# Altium PCB PCB1.PcbDoc
Units mm, origin at the board's own origin, x right, y up, seen from the top; angles counter-clockwise.
Board outline 76.19 x 12.9 mm, 4 copper layers (Top Layer, Layer 1, Layer 2, Bottom Layer), stack 1.746 mm thick; 67 components, 48 nets, 202 pads, 115 vias.
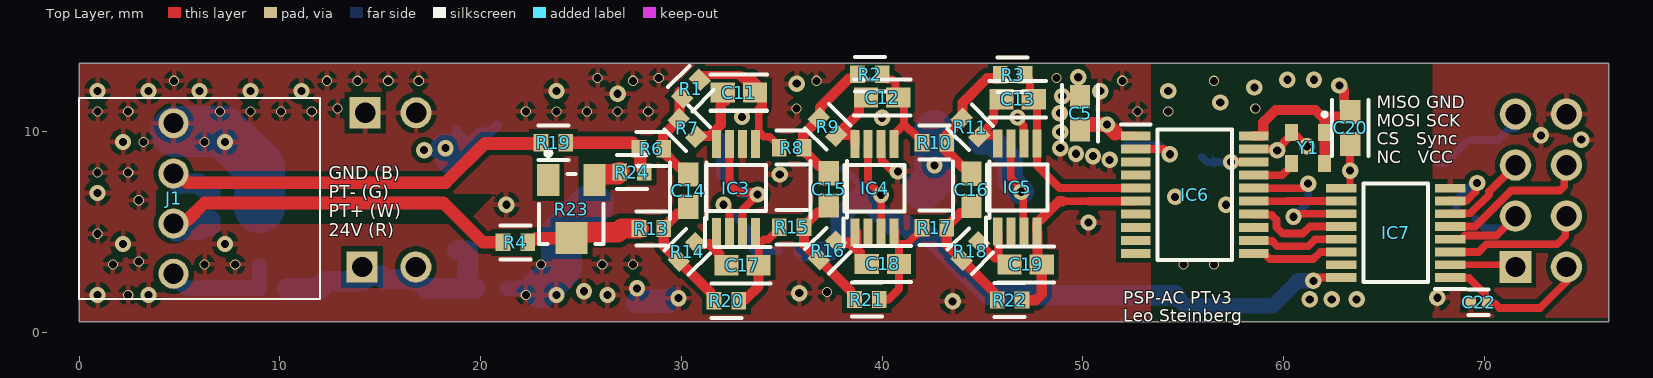
[diagram p0: Top Layer view]
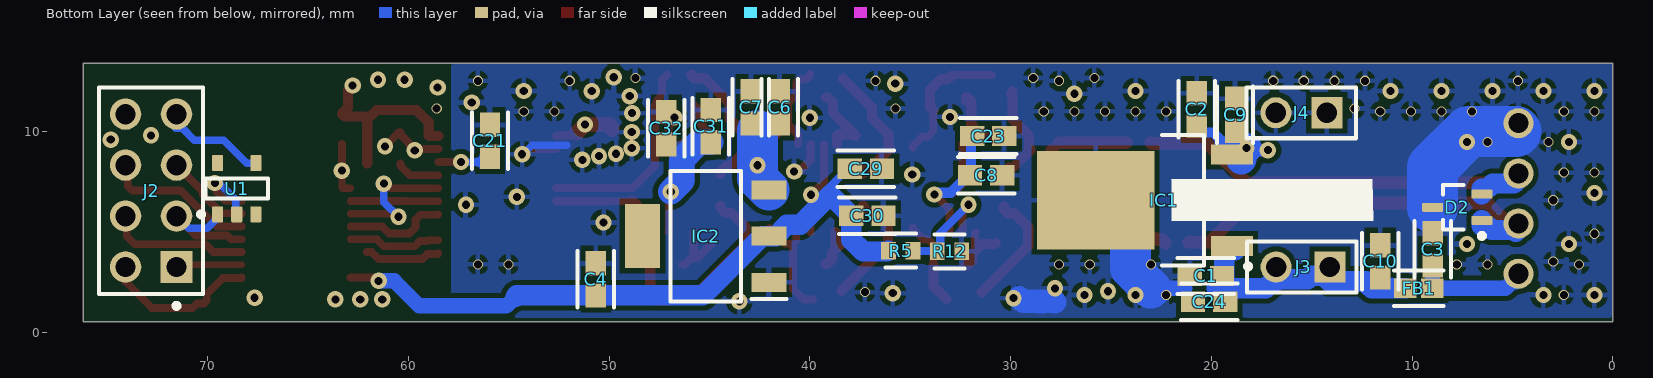
[diagram p1: Bottom Layer view, seen from below]
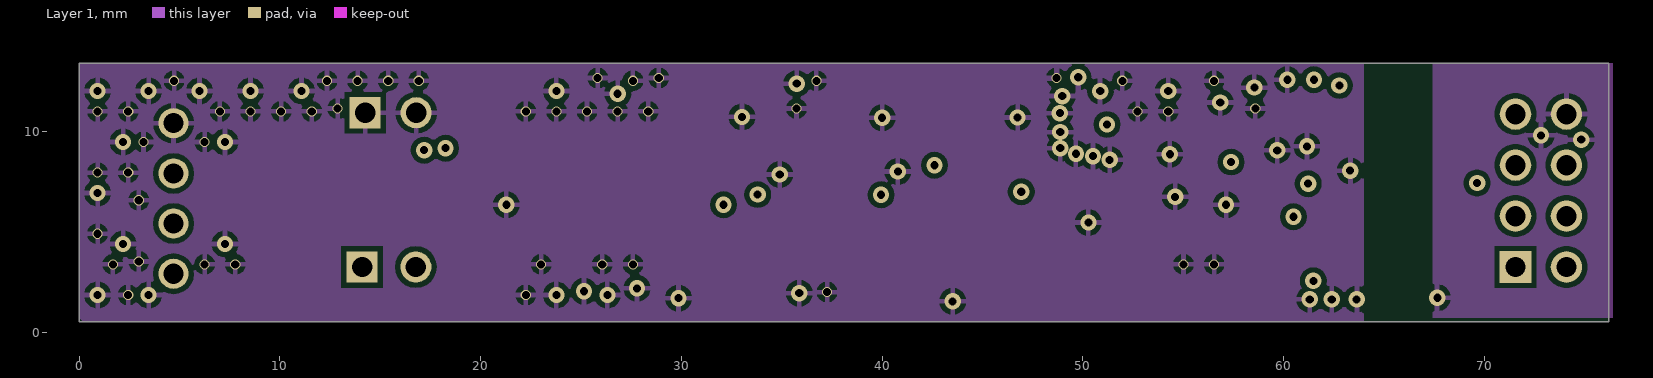
[diagram p2: Layer 1]
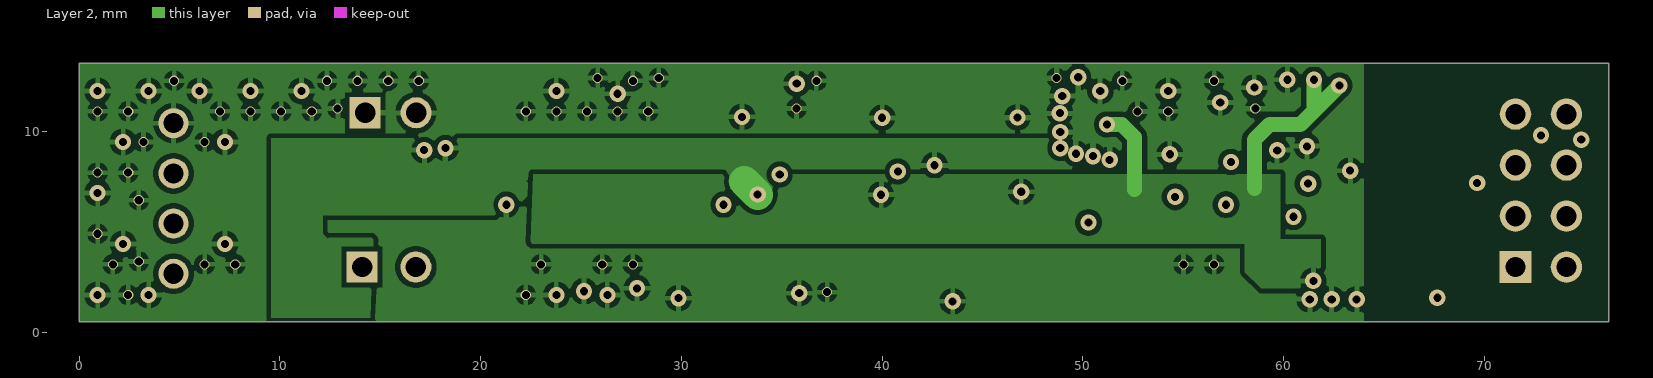
[diagram p3: Layer 2]
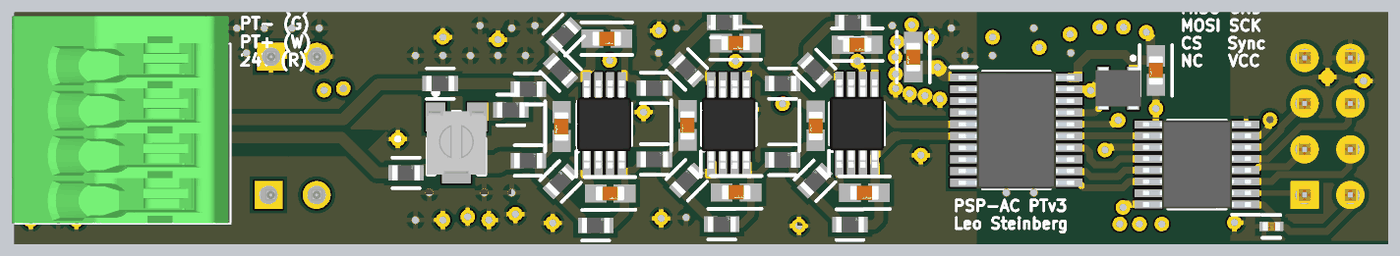
[diagram p4: 3D render of the assembled board from above, using the file's embedded part models]
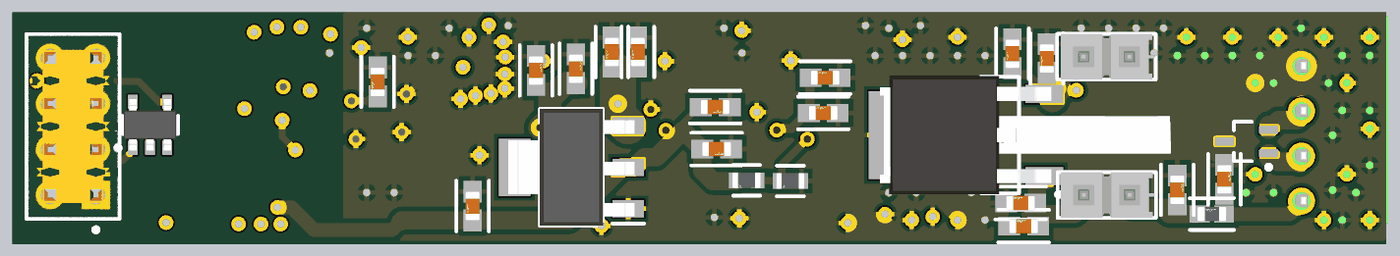
[diagram p5: 3D render of the assembled board from below, using the file's embedded part models]

## Layer stack, top to bottom
Top Solder: solder mask 0.0127, Solder Resist, Dk 3.3
Top Layer: signal copper 0.0178
Dielectric 1: prepreg 0.0711, PP-006, Dk 4.1
Layer 1: signal copper 0.035
Dielectric1: core 1.4986, FR-4, Dk 4.3
Layer 2: signal copper 0.035
Dielectric 2: prepreg 0.0711, PP-006, Dk 4.1
Bottom Layer: signal copper 0.0178
Bottom Solder: solder mask 0.0127, Solder Resist, Dk 3.3

## Board outline
0,0.508 76.194,0.508 76.194,13.409 0,13.409

## Design rules (kind name [scope] priority, off if disabled: settings)
Clearance [All] p1: gap=0.254 ignorepadtopadclearanceinfootprint=TRUE except(0.15: Arc-Arc Arc-Track Track-Track; 0.2: Arc-SMDPad Track-SMDPad SMDPad-SMDPad; 0.35: Arc-THPad Track-THPad)
DiffPairsRouting [All] p1: maxlimit=5.08 minlimit=0.254 mostfreqgap=0.381 toplayer_minwidth=0.381 toplayer_maxwidth=1.27 toplayer_prefwidth=0.508 midlayer1_minwidth=0.381 midlayer1_maxwidth=1.27 midlayer1_prefwidth=0.508 midlayer2_minwidth=0.381 midlayer2_maxwidth=1.27 midlayer2_prefwidth=0.508 bottomlayer_minwidth=0.381 bottomlayer_maxwidth=1.27 bottomlayer_prefwidth=0.508 maxuncoupledlength=12.7
HoleSize [All] p1: absolutevalues=TRUE maxlimit=2.54 minlimit=0.2 maxpercent=80.000 minpercent=20.000
MinimumSolderMaskSliver [All] p1: minsoldermaskwidth=0.105
PolygonConnect [All] p1: connectstyle=Relief reliefconductorwidth=0.254 reliefentries=4 polygonreliefangle="90 Angle" airgapwidth=0.254
RoomDefinition PCB1 [InComponentClass('PCB1')] p1 off: confinementstyle=ConfineIn formatcopy=TRUE lockcomponents=FALSE outline -189.586,-112.446 -138.786,-112.446 -138.786,-87.046 -189.586,-87.046
RoutingVias [All] p1: holewidth=0.35 width=0.45 viastyle="Through Hole" minholewidth=0.35 minwidth=0.45 maxholewidth=0.711 maxwidth=1.27
SilkToSilkClearance [All] p1: silktosilkclearance=0.105
SilkToSolderMaskClearance [IsPad] p1: minsilkscreentomaskgap=0.155 clearancetoexposedcopper=TRUE
SolderMaskExpansion [All] p1: expansion=0.102 istentingtop=FALSE
Width [All] p1: maxlimit=10 minlimit=0.2 preferedwidth=0.3 minimp=50.000000 maximp=50.000000 favimp=50.000000
25 further rules are at their usual default settings.

## Classes and differential pairs
differential pair FilterOut03: +FilterOut03_+ -FilterOut03_-
differential pair FilterOut02: +FilterOut02_+ -FilterOut02_-
differential pair F03Pin: +F03Pin_+ -F03Pin_-
differential pair F03CR: +F03CR_+ -F03CR_-
differential pair F02Pin: +F02Pin_+ -F02Pin_-
differential pair F02CR: +F02CR_+ -F02CR_-
differential pair PTin: +PTin_+ -PTin_-
differential pair FilterOut01: +FilterOut01_+ -FilterOut01_-
differential pair F01Pin01: +F01Pin01_+ -F01Pin01_-
differential pair F01CR: +F01CR_+ -F01CR_-

## Components (designator, comment, footprint, x,y, rotation, side; value= is the part's Value field where it differs from the comment)
C1 "GRM188R60J106ME47D" FP-GRM188-0_1-e0_2_0_55-IPC_A 20.272,2.801 r0 bottom
C2 "GRM188R60J106ME47D" FP-GRM188-0_1-e0_2_0_55-IPC_A 20.726,11.1 r270 bottom
C3 "GRM188R60J106ME47D" FP-GRM188-0_1-e0_2_0_55-IPC_A 8.972,4.121 r90 bottom
C4 "GRM188R60J106ME47D" FP-GRM188-0_1-e0_2_0_55-IPC_A 50.666,2.635 r270 bottom
C5 "GRM188R60J106ME47D" FP-GRM188-0_1-e0_2_0_55-IPC_A 49.861,10.914 r270 top
C6 "GRM188R60J106ME47D" FP-GRM188-0_1-e0_2_0_55-IPC_A 41.499,11.196 r270 bottom
C7 "GRM188R60J106ME47D" FP-GRM188-0_1-e0_2_0_55-IPC_A 42.94,11.196 r270 bottom
C8 "GRM188R60J106ME47D" FP-GRM188-0_1-e0_2_0_55-IPC_A 31.219,7.812 r0 bottom
C9 "GRM188R60J106ME47D" FP-GRM188-0_1-e0_2_0_55-IPC_A 18.819,10.837 r270 bottom
C10 "GRM188R60J106ME47D" FP-GRM188-0_1-e0_2_0_55-IPC_A 11.584,3.531 r90 bottom
C11 "GRM188R60J106ME47D" FP-GRM188-0_1-e0_2_0_55-IPC_A 32.86,11.938 r0 top
C12 "GRM188R60J106ME47D" FP-GRM188-0_1-e0_2_0_55-IPC_A 40.003,11.69 r0 top
C13 "GRM188R60J106ME47D" FP-GRM188-0_1-e0_2_0_55-IPC_A 46.75,11.604 r0 top
C14 "GRM188R60J106ME47D" FP-GRM188-0_1-e0_2_0_55-IPC_A 30.345,7.052 r270 top
C15 "GRM188R60J106ME47D" FP-GRM188-0_1-e0_2_0_55-IPC_A 37.338,7.114 r270 top
C16 "GRM188R60J106ME47D" FP-GRM188-0_1-e0_2_0_55-IPC_A 44.45,7.089 r270 top
C17 "GRM188R60J106ME47D" FP-GRM188-0_1-e0_2_0_55-IPC_A 33.044,3.336 r0 top
C18 "GRM188R60J106ME47D" FP-GRM188-0_1-e0_2_0_55-IPC_A 40.038,3.398 r0 top
C19 "GRM188R60J106ME47D" FP-GRM188-0_1-e0_2_0_55-IPC_A 47.15,3.373 r0 top
C20 "GRM188R60J106ME47D" FP-GRM188-0_1-e0_2_0_55-IPC_A 63.315,10.173 r270 top
C21 "GRM188R60J106ME47D" FP-GRM188-0_1-e0_2_0_55-IPC_A 55.937,9.536 r270 bottom
C22 "C0402C104K8PACTU" FP-C0402-BB-MFG 69.718,1.502 r180 top value="0.10 μF"
C23 "GRM188R60J106ME47D" FP-GRM188-0_1-e0_2_0_55-IPC_A 31.114,9.773 r0 bottom
C24 "GRM188R60J106ME47D" FP-GRM188-0_1-e0_2_0_55-IPC_A 20.106,1.519 r0 bottom
C29 "GRM188R60J106ME47D" FP-GRM188-0_1-e0_2_0_55-IPC_A 37.212,8.14 r180 bottom
C30 "GRM188R60J106ME47D" FP-GRM188-0_1-e0_2_0_55-IPC_A 37.134,5.8 r180 bottom
C31 "GRM188R60J106ME47D" FP-GRM188-0_1-e0_2_0_55-IPC_A 44.936,10.266 r90 bottom
C32 "GRM188R60J106ME47D" FP-GRM188-0_1-e0_2_0_55-IPC_A 47.15,10.169 r90 bottom
D2 "TPD2E007DCKR" DCK0003A_M 7.747,6.223 r0 bottom
FB1 "BLM18PG181SN1D" FP-BLM18-0_15-t0_8-IPC_B 9.666,2.184 r0 bottom
IC1 "L78M12ACDT-TR" TO228P972X240-3N 23.318,6.579 r0 bottom
IC2 "LM1117MPX-3.3_NOPB" SOT230P700X180-4N 45.186,4.786 r0 bottom
IC3 "THS4561IDGKT" SOP65P490X110-8N 32.719,7.177 r90 top
IC4 "THS4561IDGKT" SOP65P490X110-8N 39.624,7.169 r90 top
IC5 "THS4561IDGKT" SOP65P490X110-8N 46.736,7.208 r90 top
IC6 "ADS131M02IPWR" SOP65P640X120-20N 55.575,6.852 r0 top
IC7 "ISO7761FDBQR" SOP64P600X175-16N 65.589,4.947 r180 top
J1 "1989764" 1989764 4.699,10.411 r270 top
J2 "HTSW-104-07-G-D" FP-HTSW-104-07-G-D-MFG 72.826,7.058 r90 bottom
J3 "TSW-102-26-F-S" SMTC-TSW-102-26-XX-S#1 14.23,3.248 r0 bottom
J4 "TSW-102-26-F-S" SMTC-TSW-102-26-XX-S#2 14.247,10.932 r0 bottom
R1 "CRCW0603200KFKEA" FP-CRCW0603-e3-IPC_C 30.471,12.136 r45 top
R2 "CRCW0603200KFKEA" FP-CRCW0603-e3-IPC_C 39.388,12.85 r0 top
R3 "CRCW0603200KFKEA" FP-CRCW0603-e3-IPC_C 46.5,12.825 r0 top
R4 "CRCW0603200KFKEA" FP-CRCW0603-e3-IPC_C 21.728,4.475 r0 top
R5 "CRCW0603200KFKEA" FP-CRCW0603-e3-IPC_C 35.474,4.063 r0 bottom
R6 "CRCW0603200KFKEA" FP-CRCW0603-e3-IPC_C 28.503,9.132 r0 top
R7 "CRCW0603200KFKEA" FP-CRCW0603-e3-IPC_C 30.295,10.163 r315 top
R8 "CRCW0603200KFKEA" FP-CRCW0603-e3-IPC_C 35.496,9.194 r0 top
R9 "CRCW0603200KFKEA" FP-CRCW0603-e3-IPC_C 37.289,10.225 r315 top
R10 "CRCW0603200KFKEA" FP-CRCW0603-e3-IPC_C 42.608,9.443 r0 top
R11 "CRCW0603200KFKEA" FP-CRCW0603-e3-IPC_C 44.401,10.2 r315 top
R12 "CRCW0603200KFKEA" FP-CRCW0603-e3-IPC_C 33.044,4.027 r0 bottom
R13 "CRCW0603200KFKEA" FP-CRCW0603-e3-IPC_C 28.503,5.164 r0 top
R14 "CRCW0603200KFKEA" FP-CRCW0603-e3-IPC_C 30.295,4.002 r45 top
R15 "CRCW0603200KFKEA" FP-CRCW0603-e3-IPC_C 35.496,5.225 r0 top
R16 "CRCW0603200KFKEA" FP-CRCW0603-e3-IPC_C 37.289,4.064 r45 top
R17 "CRCW0603200KFKEA" FP-CRCW0603-e3-IPC_C 42.608,5.201 r0 top
R18 "CRCW0603200KFKEA" FP-CRCW0603-e3-IPC_C 44.401,4.039 r45 top
R19 "CRCW0603200KFKEA" FP-CRCW0603-e3-IPC_C 23.622,9.439 r0 top
R20 "CRCW0603200KFKEA" FP-CRCW0603-e3-IPC_C 32.245,1.564 r0 top
R21 "CRCW0603200KFKEA" FP-CRCW0603-e3-IPC_C 39.238,1.626 r0 top
R22 "CRCW0603200KFKEA" FP-CRCW0603-e3-IPC_C 46.35,1.601 r0 top
R23 "3313J-1-503E" BOUR-3313J-1_V 24.518,6.135 r270 top
R24 "CRCW0603200KFKEA" FP-CRCW0603-e3-IPC_C 27.539,7.977 r0 top
U1 "SN74AHC1G125DBVR" DBV0005A_L 68.555,7.148 r90 bottom
Y1 "ASDM1-8.000MHZ-LC-T" ASDM 61.223,9.177 r180 top

## Footprints (in the part's own frame and the unit in brackets; to place one, negate y for a bottom-side part, rotate by r counter-clockwise, add the part's x,y. Pads: shape width x height; smd on the part's side, far side on the other; paste and mask are expansions set on the pad)
1989764 [mm]
  round 1.5 hole 1: 1(0,0) 2(2.5,0) 3(5,0) 4(7.5,0)
  silkscreen extent -1.25,-4.7 8.75,7.3, body extent -2.77,-4.82 8.73,7.18, height 13.12
ASDM [mm]
  rect 0.65x0.85 smd: 1(-0.825,-0.775) 2(0.825,-0.775) 3(0.825,0.775) 4(-0.825,0.775)
  silkscreen extent -0.92,-1.77 -0.73,-1.58, body extent -1.25,-1.13 1.25,1.13, height 1
BOUR-3313J-1_V [mm] "SMD, 3-Leads, Body 3.5x3.2mm, Pitch 1.15mm"
  rect 1.6x1.1 smd paste+0: 1(-1.45,-1.15) 3(-1.45,1.15)
  rect 1.6x1.6 smd paste+0: 2(1.45,0)
  silkscreen extent -2.92,-1.6 1.75,1.6, body extent -1.75,-1.65 1.75,1.65, height 2.11
DBV0005A_L [mm] "SOT23, 5-Leads, Body 3.05x1.75mm, Pitch 0.95mm, IPC High Density"
  rrect18% 0.8x0.55 smd: 1(-1.275,0.95) 2(-1.275,0) 3(-1.275,-0.95) 4(1.275,-0.95) 5(1.275,0.95)
  silkscreen extent -1.4,-1.55 0.5,1.9, body extent -1.42,-1.46 1.42,1.46, height 1.08
DCK0003A_M [mm] "SOT23, 3-Leads, Body 2.15x1.4mm, Pitch 0.65mm, IPC Low Density"
  rrect22% 1.05x0.45 smd: 1(-1.225,0.65) 2(-1.225,-0.65) 3(1.225,0)
  silkscreen extent -1.35,-1.1 0.7,1.55, body extent -0.7,-1.07 0.7,1.08, height 1.1
FP-BLM18-0_15-t0_8-IPC_B [mm]
  rect 1.106x0.958 smd paste+0 mask+0: 1(-0.676,0) 2(0.676,0)
  silkscreen extent -1.23,-0.88 1.23,0.88, body extent -0.8,-0.4 0.8,0.4, height 0.95
FP-C0402-BB-MFG [mm]
  rect 0.52x0.52 smd paste+0 mask+0: 1(-0.4,0) 2(0.4,0)
  silkscreen extent -0.5,-0.64 0.5,0.64, body extent -0.8,-0.4 0.8,0.4, height 0.25
FP-CRCW0603-e3-IPC_C [mm]
  rect 0.735x0.862 smd paste+0 mask+0: 1(-0.615,0) 2(0.615,0)
  silkscreen extent -0.75,-0.85 0.75,0.85, body extent -1.08,-0.58 1.08,0.58, height 0.25
FP-GRM188-0_1-e0_2_0_55-IPC_A [mm]
  rect 1.208x1.012 smd paste+0 mask+0: 1(-0.802,0) 2(0.802,0)
  silkscreen extent -1.41,-0.91 1.41,0.91, body extent -0.8,-0.4 0.8,0.4, height 0.9
FP-HTSW-104-07-G-D-MFG [mm]
  rect 1.57x1.57 hole 1.02 paste-2539.97 mask+0: 1(-3.81,-1.27)
  round 1.57 hole 1.02 paste-2539.97 mask+0: 2(-3.81,1.27) 3(-1.27,-1.27) 4(-1.27,1.27) 5(1.27,-1.27) 6(1.27,1.27) 7(3.81,-1.27) 8(3.81,1.27)
  silkscreen extent -5.87,-2.58 5.14,2.58, body extent -5.08,-2.51 5.08,2.51, height 8.71
SMTC-TSW-102-26-XX-S#1 [mm] ".025 SQ Post Terminal Strip Assembly, 1x2 Pins, Vertical, 2.54mm Pitch, Male"
  rect 1.55x1.55 hole 1.02: 1(-0.134,0)
  round 1.55 hole 1.02: 2(2.54,0)
  silkscreen extent -1.46,-1.27 4,1.27, body extent -1.4,-1.27 3.81,1.27, height 8.38
SMTC-TSW-102-26-XX-S#2 [mm] ".025 SQ Post Terminal Strip Assembly, 1x2 Pins, Vertical, 2.54mm Pitch, Male"
  rect 1.55x1.55 hole 1.02: 1(0,0)
  round 1.55 hole 1.02: 2(2.54,0)
  silkscreen extent -1.46,-1.27 4,1.27, body extent -1.4,-1.27 3.81,1.27, height 8.38
SOP64P600X175-16N [mm]
  rect 1.528x0.435 smd: 1(-2.711,2.222) 2(-2.711,1.588) 3(-2.711,0.952) 4(-2.711,0.318) 5(-2.711,-0.318) 6(-2.711,-0.952) 7(-2.711,-1.588) 8(-2.711,-2.222) 9(2.711,-2.222) 10(2.711,-1.588) 11(2.711,-0.952) 12(2.711,-0.318) 13(2.711,0.318) 14(2.711,0.952) 15(2.711,1.588) 16(2.711,2.222)
  silkscreen extent -3.47,-2.45 1.6,2.79, body extent -3,-2.45 3,2.45, height 1.75
SOP65P490X110-8N [mm]
  rect 1.4x0.45 smd: 1(-2.2,0.975) 2(-2.2,0.325) 3(-2.2,-0.325) 4(-2.2,-0.975) 5(2.2,-0.975) 6(2.2,-0.325) 7(2.2,0.325) 8(2.2,0.975)
  silkscreen extent -2.9,-1.5 1.15,1.55, body extent -2.45,-1.5 2.45,1.5, height 1.1
SOP65P640X120-20N [mm]
  rect 1.475x0.45 smd: 1(-2.938,2.925) 2(-2.938,2.275) 3(-2.938,1.625) 4(-2.938,0.975) 5(-2.938,0.325) 6(-2.938,-0.325) 7(-2.938,-0.975) 8(-2.938,-1.625) 9(-2.938,-2.275) 10(-2.938,-2.925) 11(2.938,-2.925) 12(2.938,-2.275) 13(2.938,-1.625) 14(2.938,-0.975) 15(2.938,-0.325) 16(2.938,0.325) 17(2.938,0.975) 18(2.938,1.625) 19(2.938,2.275) 20(2.938,2.925)
  silkscreen extent -3.67,-3.25 1.85,3.5, body extent -3.2,-3.25 3.2,3.25, height 1.2
SOT230P700X180-4N [mm]
  rect 1.75x0.95 smd: 1(-3.15,2.3) 2(-3.15,0) 3(-3.15,-2.3)
  rect 1.75x3.2 smd: 4(3.15,0)
  silkscreen extent -4.03,-3.25 1.75,3.25, body extent -3.5,-3.25 3.5,3.25, height 1.68
TO228P972X240-3N [mm]
  rect 2.1x1 smd: 1(-4.35,2.28) 3(-4.35,-2.28)
  rect 5.85x4.9 smd: 4(2.45,0)
  silkscreen extent -5.27,-3.25 -0.85,3.42, body extent -4.78,-3.3 4.75,3.3, height 2.3

## Part data
C1 C2 C3 C4 C5 C6 C7 C8 C9 C10 C11 C12 C13 C14 C15 C16 C17 C18 C19 C20 C21 C23 C24 C29 C30 C31 C32: library part CMP-2006-02792-2, "Chip Multilayer Ceramic Capacitors for General Purpose, 0603, 10uF, X5R, 15%, 20%, 6.3V", Capacitance=10uF, Case Code (Imperial)=0603, Case Code (Metric)=1608, Dielectric=X5R, Max Operating Temperature=85°C, Min Operating Temperature=-55°C, Package Quantity=4000, Tolerance=20%, Voltage=6.3V, Case/Package=0603, Depth=0.8mm, Height=0.8mm, Lead Free="Lead Free", Length=1.6mm, Material=Ceramic, Mount="Surface Mount", Packaging="Tape and Reel", Radiation Hardening=No, REACH SVHC="No SVHC", Termination=SMD/SMT, Thickness=0.035inch, Voltage Rating=6.3V, Voltage Rating (DC)=6.3V, Width=0.031inch
C22: library part CMP-2008-02046-2, "CAP CER 0.1UF 10V X5R 0402", Capacitance="0.10 μF", Manufacturer=Kemet, Package=C0402-BB, Temperature="-55°C to +125°C", Temperature Characteristic=X5R, Temperature Coefficient=15%, Temperature Range High=+125°C, Temperature Range Low=-55°C, Tolerance=0.1, Voltage Rating="10 V", Automotive=No, Category=Cap, ComponentLink2Description=Datasheet, ComponentLink2URL=https://content.kemet.com/datasheets/KEM_C1002_X7R_SMD.pdf, Device Class L1="Passive Components", Device Class L2=Capacitors, Device Class L3="Ceramic Capacitors", Digikey Description="CAP CER 0.1UF 10V X5R 0402", Height=0.55mm, Ipc Land Pattern Name=CAPC10050X50, Lead Free=Yes, Manufacturer Part Number=C0402C104K8PACTU, Material=Ceramic, Mouser Description="Capacitor 100 nF 10 VDC 0402", Octopart=https://octopart.com/c0402c104k8pactu-kemet-140039, RoHS=TRUE
D2: library part CMP-0326-00069-3, "ESD Protection Array for AC Signal Data Interface, 2 Channels, -40 to +85 degC, 3-pin SC70 (DCK), Green (RoHS & no Sb/Br)", Breakdown Voltage(Min)(V)=+/-14, IO Capacitance(Typ)(pF)=15, IO Leakage Current(nA)=50, Manufacturer="Texas Instruments", ComponentLink1Description="Manufacturer URL", ComponentLink1URL=http://www.ti.com/, ComponentLink2Description=Datasheet, ComponentLink2URL=http://www.ti.com/general/docs/lit/getliterature.tsp?genericPartNumber=TPD2E007&fileType=pdf, ComponentLink3Description="URL Link1", ComponentLink3URL=SamplesURL:http://www.ti.com/product/tpd2e007#samples, DatasheetVersion=SLVS796E, Eco-Plan="Green (RoHS & no Sb/Br)", IEC 61000-4-2 Air-Gap(+/- kV)=15, IEC 61000-4-2 Contact(+/- kV)=8, Mounting Technology="Surface Mount", PackageDescription="3-Pin Plastic Small-Outline Package, 0.65 mm Pitch, 2.1 mm Lead Span", PackageReference=DCK0003A, PackageVersion="revG, Jan-2007", PartNumber=TPD2E007DCKR, SubFamily="ESD Solution"
FB1: library part CMP-0686-00566-4, "Chip Ferrite Bead, 0603, 180Ω @ 100MHz, 0.09Ω, 25%, 1.5A", Case Code (Imperial)=0603, Case Code (Metric)=1608, Current Rating=1.5A, DC Resistance (DCR)=90mR, Max Operating Temperature=125°C, Min Operating Temperature=-55°C, Package Quantity=1, Test Frequency=100MHz, Tolerance=25%, Case/Package=0603, Core Material=Ferrite, DC Current=1.5A, Depth=0.8mm, Height=0.8mm, Impedance=180R, Lead Free="Lead Free", Length=1.6mm, Material=Ferrite, Max Current Rating=1.5A, Max DC Current=1.5A, Number of Circuits=1, Number of Lines=1, Number of Pins=2, Packaging="Tape and Reel", Radiation Hardening=No, REACH SVHC="No SVHC", Shielding=Unshielded, Termination=SMD/SMT, Width=0.8mm
IC1: "Integrated Circuit", Manufacturer_Name=STMicroelectronics, Mouser Part Number=511-L78M12ACDT-TR, Arrow Part Number=L78M12ACDT-TR, Arrow Price/Stock=https://www.arrow.com/en/products/l78m12acdt-tr/stmicroelectronics?region=europe, Datasheet Link=http://www.st.com/web/en/resource/technical/document/datasheet/CD00000447.pdf, Height=2.4mm, Manufacturer_Part_Number=L78M12ACDT-TR, Mouser Price/Stock=https://www.mouser.co.uk/ProductDetail/STMicroelectronics/L78M12ACDT-TR?qs=LkYMrcPpezwdZZt22czJ6w%3D%3D
IC2: "Integrated Circuit", Arrow Part Number=LM1117MPX-3.3/NOPB, Manufacturer_Name="Texas Instruments", Mouser Part Number=926-LM1117MPX3.3NOPB, Arrow Price/Stock=https://www.arrow.com/en/products/lm1117mpx-3.3nopb/texas-instruments?utm_currency=USD&region=nac, Datasheet Link=http://www.ti.com/lit/ds/symlink/lm1117.pdf, Height=1.8mm, Manufacturer_Part_Number=LM1117MPX-3.3/NOPB, Mouser Price/Stock=https://www.mouser.co.uk/ProductDetail/Texas-Instruments/LM1117MPX-3.3-NOPB?qs=X1J7HmVL2ZHRbBIxXi4utg%3D%3D
IC3 IC4 IC5: "Integrated Circuit", Manufacturer_Name="Texas Instruments", Mouser Part Number=595-THS4561IDGKT, Datasheet Link=http://www.ti.com/general/docs/suppproductinfo.tsp?distId=10&gotoUrl=http%3A%2F%2Fwww.ti.com%2Flit%2Fgpn%2Fths4561, Height=1.1mm, Manufacturer_Part_Number=THS4561IDGKT, Mouser Price/Stock=https://www.mouser.co.uk/ProductDetail/Texas-Instruments/THS4561IDGKT?qs=YCa%2FAAYMW01gTL9xVldK5g%3D%3D
IC6: "Integrated Circuit", Manufacturer_Name="Texas Instruments", Mouser Part Number=595-ADS131M02IPWR, Datasheet Link=https://www.ti.com/lit/ds/symlink/ads131m02.pdf?ts=1625206837949&ref_url=https%253A%252F%252Fau.mouser.com%252F, Height=1.2mm, Manufacturer_Part_Number=ADS131M02IPWR, Mouser Price/Stock=https://www.mouser.co.uk/ProductDetail/Texas-Instruments/ADS131M02IPWR?qs=Jslch3jnSjnQbmaVWlpv6A%3D%3D
IC7: "Integrated Circuit", Manufacturer_Name="Texas Instruments", Mouser Part Number=595-ISO7761FDBQR, Arrow Part Number=ISO7761FDBQR, Arrow Price/Stock=null?region=nac, Datasheet Link=http://www.ti.com/lit/ds/symlink/iso7761.pdf?HQS=TI-null-null-mousermode-df-pf-null-wwe&DCM=yes&ref_url=https%3A%2F%2Fwww.mouser.it%2F, Height=1.75mm, Manufacturer_Part_Number=ISO7761FDBQR, Mouser Price/Stock=https://www.mouser.co.uk/ProductDetail/Texas-Instruments/ISO7761FDBQR?qs=rrS6PyfT74cjDQv76P1Z2w%3D%3D
J1: "Connector", Manufacturer_Name="Phoenix Contact", Mouser Part Number=651-1989764, Arrow Part Number=1989764, Arrow Price/Stock=https://www.arrow.com/en/products/1989764/phoenix-contact?utm_currency=USD&region=nac, Datasheet Link=https://datasheet.datasheetarchive.com/originals/distributors/SFDatasheet-2/sf-00059246.pdf, Height=13.1mm, Manufacturer_Part_Number=1989764, Mouser Price/Stock=https://www.mouser.co.uk/ProductDetail/Phoenix-Contact/1989764?qs=sps7W%2FwBcGHERoDeZBKW2Q%3D%3D
J2: library part CMP-02766-000066-1, "CONN HEADER VERT 8POS 2.54MM", Current Rating=6.3A, Manufacturer=Samtec, Temperature="-55°C to +125°C", Temperature Range High=+125°C, Temperature Range Low=-55°C, Voltage Rating=550V, Automotive=No, Category=Conn, ComponentLink2Description=Datasheet, ComponentLink2URL=http://suddendocs.samtec.com/prints/htsw-xxx-xx-xxx-x-xx-xx-xx-mkt.pdf, Conn Gender=Male, Conn Orientation=Straight, Contact Material=Gold,Nickel, Device Class L1=Connectors, Device Class L2="Headers and Wire Housings", Device Class L3=unset, Digikey Description="CONN HEADER VERT 8POS 2.54MM", Footprint Url=http://suddendocs.samtec.com/prints/htsw-xxx-xx-xxx-x-xx-xx-xx-footprint.pdf, Height=8.71mm, Lead Free=Yes, Manufacturer Part Number=HTSW-104-07-G-D, Number of Contacts=8, Number of Rows=2, Octopart=https://octopart.com/htsw-104-07-g-d-samtec-10613822, Package=HTSW-104-07-G-D, Pitch=2.54mm, RoHS=TRUE
J3 J4: library part CMP-1024-00329-1, "0.025\" SQ Post Header, Through-hole, Vertical, -55 to 125 degC, 2.54 mm Pitch, 2-Pin, Male, RoHS", Manufacturer=Samtec, Temperature range="-55 to 125 degC", ComponentLink1Description="Manufacturer URL", ComponentLink1URL=http://www.samtec.com, ComponentLink2Description=Datasheet, ComponentLink2URL=http://www.samtec.com/documents/webfiles/pdf/TSW_TH.PDF, ComponentLink3Description="Package Specification", ComponentLink3URL=http://www.samtec.com/documents/webfiles/cpdf/TSW-XXX-XX-XXX-X-XX-XXX-MKT.pdf, DatasheetVersion=F-214, Mounting Technology=Through-hole, Orientation=Vertical, PackageDescription=".025[0.64] SQ. Post Terminal Strip Assembly", PackageReference=TSW-102-26-XX-S, PackageVersion="DM, 8/1988", PartNumber=TSW-102-26-F-S, Pitch="2.54 mm", RoHS=True
R1 R2 R3 R4 R5 R6 R7 R8 R9 R10 R11 R12 R13 R14 R15 R16 R17 R18 R19 R20 R21 R22 R24: library part CMP-2000-03059-2, "RES Thick Film, 200kΩ, 1%, 0.1W, 100ppm/°C, 0603", Case Code (Imperial)=0603, Case Code (Metric)=1608, Max Operating Temperature=155°C, Max Power Dissipation=100mW, Min Operating Temperature=-55°C, Package Quantity=10, Resistance=200kR, Temperature Coefficient=100ppm/°C, Tolerance=1%, Voltage Rating=75V, Case/Package=0603, Composition="Thick Film", Contact Plating=Tin, Depth=0.85mm, Features="Automotive AEC-Q200", Height=0.45mm, Lead Free="Lead Free", Length=1.55mm, Military Standard=Not, Mount="Surface Mount", Number of Terminations=2, Packaging="Tape and Reel", Power Rating=100mW, Radiation Hardening=No, Termination=SMD/SMT, Voltage Rating (DC)=75V, Weight=7.1E-05oz, Width=0.033inch, Working Voltage=75V
R23: library part CMP-2000-05588-1, "3 mm Trimpot(R) Trimming Potentiometer, 50 KOhm, +/- 20%, 0.125 W, -55 to 125 degC, 3-Pin SMD, RoHS, Tape and Reel", Manufacturer=Bourns, Package Description="3-Pin Surface Mount Device, Body 3.5 x 3.2 mm, Pitch 1.15 mm", Package Reference=3313J-1, Power Rating=125mW, Resistance Tolerance=±20%, Temperature Coefficient=±150ppm/°C, Track Resistance=50kohm, Datasheet URL=http://www.bourns.com/docs/Product-Datasheets/3313.pdf, Datasheet Version=05/2016, Manufacturer URL=http://www.bourns.com/, Mounting Technology=SurfaceMount, No. of Turns=1, Potentiometer Mounting=SMD, SVHC=NoSVHC(19-Dec-2012)
U1: library part CMP-0859-00131-3, "Single Bus Buffer Gate with 3-State Output, DBV0005A, LARGE T&R", F @ Nom Voltage(Max)(Mhz)=75, Generic Part Number=SN74AHC1G125, ICC @ Nom Voltage(Max)(mA)=0.01, Manufacturer="Texas Instruments", Operating Temperature Range(C)="-40 to 125", Rating=Catalog, tpd @ Nom Voltage(Max)(ns)=11.5,7.5, Voltage(Nom)(V)=3.3,5, 3-State Output=Yes, Bits(#)=1, DatasheetVersion=SCLS377K, Input Type=CMOS, Logic=True, Output Drive (IOL/IOH)(Max)(mA)=50/-50, Output Type=CMOS, PackageReference=DBV0005A, Schmitt Trigger=No, Sub-Family="Non-Inverting Buffer/Driver", Technology Family=AHC, VCC(Max)(V)=5.5, VCC(Min)(V)=2
Y1: "Crystal or Oscillator", Manufacturer_Name=ABRACON, Mouser Part Number=815-ASDM1-8.0-LCT, Arrow Part Number=ASDM1-8.000MHZ-LC-T, Arrow Price/Stock=https://www.arrow.com/en/products/asdm1-8.000mhz-lc-t/abracon, Datasheet Link=https://abracon.com/Oscillators/ASDM.pdf, Height=0.9mm, Manufacturer_Part_Number=ASDM1-8.000MHZ-LC-T, Mouser Price/Stock=https://www.mouser.co.uk/ProductDetail/ABRACON/ASDM1-8000MHZ-LC-T/?qs=K8BHR703ZXikMOgIhO5uZA%3D%3D

## Via types
v1: diameter 0.813, hole 0.406, Top Layer to Bottom Layer, 69 vias
v2: diameter 0.508, hole 0.406, Top Layer to Bottom Layer, tented both sides, 46 vias

## Nets (pads, with @x,y where several pads share a name; then routed paths per layer and width w, separated by ;. In a path a pad name is that pad's centre, name@x,y a point inside that pad or via, vN(x,y) a via of type N, cw(c..) or ccw(c..) an arc to the next point about the centre after c; other vN are vias at no path point)
3v3iso0: C4.2 C5.2 C20.1 C29.1 C30.1 C31.1 C32.1 IC2.2 IC4.3 IC4.7 IC5.3 IC5.7 IC6.1 IC6.20 IC7.16 R5.2 Y1.1 Y1.4 | length 72.4
  Top Layer w0.381: IC4.7 39.299,7.494 v1(39.949,6.844) IC4.3 ; IC5.7 46.411,7.687 46.936,7.162 v1(46.936,6.995) 47.026,6.904 47.026,5.043 IC5.3
  Top Layer w0.406: 51.621,9.933 51.756,9.798 52.615,9.798 IC6.1 ; v1(61.486,2.556) 61.514,2.556 61.683,2.725 IC7.16
  Top Layer w0.508: IC6.20 58.959,9.777 58.988,9.806 58.988,10.451 59.306,10.768 59.603,11.066 61.586,11.066 62.048,10.604 ; Y1.4 Y1.1 62.048,10.604 ; v1@63.012,12.049 63.012,11.18 63.315,10.877 63.19,10.752 62.196,10.752 62.048,10.604
  Top Layer w0.762: C5.2 49.861,10.211 49.986,10.336 50.084,10.336 50.099,10.351 v1(51.203,10.351) 51.621,9.933
  Layer 2 w0.762: v1(51.203,10.351) 51.939,10.351 52.578,9.712 52.578,7.105 ; 58.548,7.177 58.548,9.588 59.31,10.351 60.838,10.351 61.513,11.025 ; v1(61.514,12.575) 61.513,12.573 61.513,11.025 ; v1(62.781,12.294) 61.513,11.025
  Bottom Layer w0.381: C29.1 38.112,8.14 39.194,7.058
  Bottom Layer w0.762: 54.664,1.772 55.125,1.31 59.461,1.31 60.707,2.556 v1(61.486,2.556)
  Bottom Layer w1.016: R5.2 36.133,4.019 37.341,4.019 37.936,4.614 C30.1 38.979,6.844 40.48,5.343 41.145,5.343 41.702,4.786 IC2.2 42.37,4.786 45.323,1.833 C4.2 54.603,1.833 54.664,1.772
  Bottom Layer w1.27: C31.1 45.518,9.464 46.384,8.599 46.384,7.547 v1(46.936,6.995)
CLKIN: IC6.17 Y1.3 | length 2.2
  Top Layer w0.381: IC6.17 59.922,7.827 60.398,8.302 Y1.3
CSISO00: IC7.15
CSISO01: IC6.12 IC7.13 | length 4.6
  Top Layer w0.381: IC6.12 59.026,4.577 59.06,4.542 59.432,4.542 59.693,4.282 61.223,4.282 61.57,4.628 IC7.13
CSmain0: IC7.2 J2.1 | length 3.3
  Top Layer w0.305: IC7.2 71.445,3.359 J2.1
CSmain1: IC7.4 J2.3 U1.1 | length 6.4
  Top Layer w0.381: IC7.4 68.847,4.629 69.037,4.819 70.62,4.819 J2.3@71.702,5.901
  Bottom Layer w0.381: U1.1@69.555,5.659 70.032,5.182 70.951,5.182 J2.3
F01CR_+: C14.1 R1.1 R6.2 R7.1 | length 5.2
  Top Layer w0.508: R7.1 29.905,10.643 29.905,11.731 29.955,11.781 29.955,11.941 R1.1@29.91,11.986 ; R7.1@29.882,10.577 29.082,9.778 29.082,9.198 29.017,9.132 29.017,9.068 29.881,8.204 30.093,8.204 30.345,7.952 C14.1
F01CR_-: C14.2 R13.2 R14.1 R20.1 | length 5.9
  Top Layer w0.508: C14.2 30.345,6.152 30.093,5.9 29.791,5.9 29.118,5.227 R13.2 29.118,4.309 R14.1 R20.1@31.439,1.989
F01Pin01_+: C11.1 IC3.8 R7.2 | length 3
  Top Layer w0.508: R7.2@30.773,9.728 30.818,9.773 31.41,9.773 31.958,10.321 31.958,11.27 ; C11.1@32.208,11.716 32.152,11.716 31.958,11.522 C11.1@32.21,11.522
F01Pin01_-: C17.1 IC3.1 R14.2 | length 3.1
  Top Layer w0.381: IC3.1 31.779,4.943 31.779,4.012 31.892,3.898
  Top Layer w0.508: R14.2 30.776,4.392 31.398,4.392 31.779,4.012 ; 31.892,3.898 31.892,3.588 32.144,3.336 C17.1
F02CR_+: C15.1 R2.1 R8.2 R9.1 | length 6.4
  Top Layer w0.508: R9.1 36.899,10.705 36.899,11.19 38.335,12.626 ; R9.1@36.896,10.66 36.076,9.839 36.076,9.259 36.01,9.194 36.01,9.13 36.874,8.266 37.086,8.266 37.338,8.014 C15.1
F02CR_-: C15.2 R15.2 R16.1 R21.1 | length 5.9
  Top Layer w0.508: C15.2 37.338,6.214 37.086,5.962 36.784,5.962 36.112,5.289 R15.2 36.112,4.371 R16.1 R21.1@38.432,2.051
F02Pin_+: C12.1 IC4.8 R9.2 | length 3.9
  Top Layer w0.508: R9.2 R9.2@37.769,9.835 ; IC4.8 38.649,9.786 38.6,9.835 R9.2@37.769,9.835 ; C12.1 39.103,11.69 38.851,11.438 38.851,10.917 R9.2@37.769,9.835
F02Pin_-: C18.1 IC4.1 R16.2 | length 4.6
  Top Layer w0.381: IC4.1@38.738,5.039 38.772,5.004 38.772,4.074 38.886,3.96
  Top Layer w0.406: R16.2 37.769,4.454 38.61,4.454 38.649,4.494 IC4.1
  Top Layer w0.508: R16.2 37.769,4.454 38.391,4.454 38.772,4.074 ; 38.886,3.96 38.886,3.65 39.138,3.398 C18.1
F03CR_+: C16.1 R3.1 R10.2 R11.1 | length 7.1
  Top Layer w0.508: R11.1 44.011,10.68 44.011,11.433 45.226,12.648 45.771,12.648 45.884,12.762 R3.1 ; R11.1@44.008,10.635 43.188,9.815 43.188,9.235 43.122,9.169 43.122,9.106 43.986,8.241 44.198,8.241 44.45,7.989 C16.1
F03CR_-: C16.2 R17.2 R18.1 R22.1 | length 5.9
  Top Layer w0.508: C16.2 44.45,6.189 44.198,5.937 43.896,5.937 43.224,5.264 R17.2 43.224,4.346 R18.1 R22.1@45.544,2.026
F03Pin_+: C13.1 IC5.8 R11.2 | length 3.3
  Top Layer w0.406: IC5.8 45.761,9.788 45.739,9.81 44.881,9.81 R11.2 45.558,10.488 45.558,11.102 C13.1@45.771,11.315
F03Pin_-: C19.1 IC5.1 R18.2 | length 3.4
  Top Layer w0.406: R18.2 45.634,3.676 C19.1@45.947,3.676 ; IC5.1 45.783,4.987 45.783,3.84 C19.1@45.947,3.676 ; C19.1 46.25,3.373 C19.1@45.947,3.676
FilterIn01_+: R6.1 R19.2 R24.2 | length 4.6
  Top Layer w0.61: R19.2 R6.1@27.581,9.439 ; R6.1 27.95,9.069 27.95,8.245 28.155,8.04 R24.2
FilterOut01_+: C11.2 IC3.5 R1.2 R8.1 | length 7
  Top Layer w0.381: R1.2@30.907,12.812 32.923,12.812 33.01,12.724 ; 33.846,11.038 33.846,10.004 34.116,9.735 34.403,9.735 34.881,9.257 R8.1
  Top Layer w0.508: 33.01,12.724 33.123,12.611 33.486,12.611 34.01,12.087 34.01,11.202 33.846,11.038
FilterOut01_-: C17.2 IC3.4 R15.1 R20.2 | length 4.4
  Top Layer w0.381: C17.2 33.846,4.35 34.116,4.62 34.339,4.62 34.881,5.162 R15.1
  Top Layer w0.508: R20.2@33.193,1.635 33.846,2.289 C17.2
FilterOut02_+: C12.2 IC4.5 R2.2 R10.1 | length 5.6
  Top Layer w0.406: R2.2 40.003,12.786 40.167,12.622 40.231,12.622 40.257,12.596 40.493,12.596 40.66,12.429 40.66,11.835 C12.2 41.099,11.396 41.099,10.344 ; IC4.5 40.599,9.844 41.099,10.344 ; R10.1 41.993,9.507 41.443,10.056 41.386,10.056 41.099,10.344
FilterOut02_-: C18.2 IC4.4 R17.1 R21.2 | length 5.7
  Top Layer w0.381: IC4.4@40.688,5.039 40.688,4.564 40.839,4.412 C18.2 ; 40.839,4.404 41.259,4.404 41.993,5.137 R17.1
  Top Layer w0.406: R21.2 40.321,1.626 40.839,2.144 C18.2
FilterOut03_+: C13.2 IC5.5 IC6.5 R3.2 | length 10.1
  Top Layer w0.406: R3.2 47.361,12.579 47.361,11.907 C13.2 47.711,11.301 47.711,8.31 48.844,7.177 IC6.5
FilterOut03_-: C19.2 IC5.4 IC6.6 R22.2 | length 10.1
  Top Layer w0.381: 48.983,6.527 50.275,6.527
  Top Layer w0.406: 50.275,6.527 IC6.6
  Top Layer w0.508: R22.2 46.979,1.588 47.654,1.588 47.951,1.885 C19.2 47.74,3.585 47.74,4.979 IC5.4 47.711,5.425 48.812,6.527 48.983,6.527
GND: C22.2 IC7.8 J2.8
  other v1: 67.664,1.715 74.829,9.592 72.826,9.805
GNDISO0: C1.2 C2.1 C3.2 C4.1 C5.1 C6.1 C7.1 C8.1 C9.1 C10.2 C20.2 C21.1 C23.1 C24.2 C29.2 C30.2 C31.2 C32.2 D2.3 IC1.4 IC2.1 IC3.6 IC4.6 IC5.6 IC6.2 IC6.19 IC7.9 J1.1 J4.1 J4.2 R12.1 Y1.2 | length 29.3
  Top Layer w0.356: IC7.9 63.275,7.169 63.315,7.208 v1(63.315,8.047)
  Top Layer w0.381: Y1.2@60.405,9.952 60.472,9.952 v1(61.166,9.258)
  Top Layer w0.406: IC4.6 39.971,9.347 39.971,8.579 40.468,8.082 40.706,8.082 v1(40.784,8.004) ; v1(46.75,10.698) 46.75,10.588 47.039,10.298 47.039,9.43 IC5.6 ; IC6.2 54.043,9.127 54.307,8.862 v1(54.335,8.862) ; IC6.19 59.721,9.127 59.989,9.395 59.989,9.443 60.398,9.852 Y1.2 ; v1(63.315,8.047) C20.2
  Bottom Layer w0.356: 52.095,9.315 53.84,9.315 54.294,8.862 v1(54.335,8.862)
  Bottom Layer w0.406: v1@50.266,5.45 v1(50.278,5.463)
  Bottom Layer w0.762: 21.325,2.184 23.024,2.184
  Bottom Layer w1.143: 27.79,1.505 27.823,1.538 29.392,1.538 v1@29.583,1.729
  Bottom Layer w2.032: 23.024,2.184 24.028,3.189 24.028,4.917 25.462,6.351 IC1.4@25.619,6.351
  Bottom Layer w2.54: J1.1@4.826,9.999 7.19,9.999 8.972,8.217 D2.3
  other v1: 43.514,1.536 61.307,1.634 62.398,1.634 63.641,1.634 29.856,1.697 0.914,1.854 3.454,1.854 23.774,1.854 26.314,1.854 35.872,1.945 25.146,2.041 27.79,2.184 2.184,4.394 7.264,4.394 21.281,6.351 57.137,6.351 54.6,6.743 0.914,6.934 34.9,7.856 51.334,8.586 50.506,8.771 49.656,8.89 59.689,9.057 48.877,9.17 2.184,9.474 7.264,9.474 48.877,9.97 40.003,10.684 33.02,10.724 48.855,10.914 56.843,11.442 48.973,11.76 26.824,11.882 0.914,12.014 3.454,12.014 5.994,12.014 8.534,12.014 11.074,12.014 23.774,12.014 50.867,12.009 54.254,12.014 58.548,12.187 35.745,12.382 60.192,12.575 49.77,12.7
  other v2: 2.438,1.854 22.25,1.854 37.258,1.998 1.676,3.378 6.248,3.378 7.772,3.378 23.012,3.378 26.06,3.378 27.584,3.378 55.016,3.378 56.54,3.378 2.968,3.522 0.914,4.902 2.968,6.57 0.914,7.95 2.438,7.95 3.2,9.474 6.248,9.474 0.914,10.998 2.438,10.998 7.01,10.998 8.534,10.998 10.058,10.998 11.582,10.998 22.25,10.998 23.774,10.998 25.298,10.998 26.822,10.998 28.346,10.998 52.73,10.998 54.254,10.998 12.874,11.142 35.734,11.142 58.594,11.142 4.724,12.522 12.344,12.522 13.868,12.522 15.392,12.522 16.916,12.522 27.584,12.522 36.728,12.522 51.968,12.522 56.54,12.522 25.828,12.666 28.876,12.666 48.688,12.666
IsoPower0: C1.1 C10.1 C24.1 FB1.2 IC1.1 J3.1 J3.2 | length 12.5
  Bottom Layer w1.016: FB1.2 12.018,2.184 12.126,2.293 12.126,2.481 12.128,2.483 12.222,2.483 12.28,2.541 14.118,2.541 14.385,2.808 15.031,2.808 15.196,2.643 16.69,2.643 16.792,2.541 16.937,2.541 17.293,2.184 19.627,2.184 ; IC1.1@18.819,4.071 19.353,4.071 19.361,4.063 19.361,2.451 19.627,2.184 ; 19.721,2.184 19.627,2.184
MISO3state: IC7.7 U1.2 | length 4
  Top Layer w0.381: IC7.7 68.327,6.562 69.12,6.562 69.56,7.001 69.56,7.352 v1(69.642,7.434)
  Bottom Layer w0.381: U1.2@68.605,5.873 68.607,5.875 68.607,6.597 69.361,7.352 69.56,7.352 v1(69.642,7.434)
MISOI\iso0: IC6.15 IC7.10 | length 4.4
  Top Layer w0.381: IC6.15 60.184,6.527 60.192,6.535 IC7.10
MISOmain: J2.7 U1.4 | length 4.6
  Bottom Layer w0.381: U1.4@67.655,8.423 68.063,8.423 69.21,9.57 70.665,9.57 71.256,10.161 J2.7@71.578,10.161
MOSIiso0: IC6.16 IC7.11 | length 7.2
  Top Layer w0.381: IC6.16 60.965,7.177 61.189,7.401 v1(61.223,7.401) ; v1(60.492,5.748) 60.643,5.9 IC7.11@62.878,5.9
  Bottom Layer w0.381: v1(60.492,5.748) 61.223,6.479 v1(61.223,7.401)
MOSImain: IC7.6 J2.5 | length 4.4
  Top Layer w0.381: IC7.6@68.3,5.9 68.319,5.918 69.308,5.918 70.238,6.848 70.238,7.01 J2.5
NetC21_2: C21.2 IC6.18 | length 2.7
  Top Layer w0.381: v1(57.385,8.474) 57.386,8.476 58.512,8.476 IC6.18
  Bottom Layer w0.381: C21.2 56.197,8.474 v1(57.385,8.474)
NetR23_3: R23.3 R24.1 | length 1.6
  Top Layer w1.016: R23.3 25.668,7.835 25.71,7.877 26.824,7.877 R24.1
PT_AT_+: R4.2 R13.1 R23.2 | length 5.9
  Top Layer w0.61: R4.2@22.29,4.421 22.29,4.485 22.406,4.601 22.679,4.601 22.763,4.685 R23.2
  Top Layer w1.016: R23.2 24.81,4.977 26.842,4.977 27.029,5.164 R13.1
PTin_+: D2.1 J1.3 R4.1 | length 19.7
  Top Layer w0.635: J1.3 4.865,5.576 5.379,5.576 6.241,6.438 18.146,6.438 20.11,4.475 R4.1
  Bottom Layer w1.016: J1.3@4.826,4.999 4.919,5.092 6.041,5.092 6.239,5.29 6.505,5.29 6.522,5.307 D2.1
PTin_-: D2.2 J1.2 R19.1 | length 21.4
  Top Layer w0.635: J1.2 4.933,7.911 5.393,7.451 18.256,7.451 20.205,9.4 22.967,9.4 R19.1
  Bottom Layer w1.016: J1.2@4.826,7.499 4.919,7.406 5.989,7.406 6.239,7.156 6.505,7.156 6.522,7.139 D2.2
PTPowerIn: C3.1 FB1.1 J1.4 | length 5.4
  Bottom Layer w0.762: J1.4@4.826,2.499 5.026,2.499 5.34,2.184 FB1.1 8.981,2.194 8.981,3.31 C3.1
SCKiso0: IC6.14 IC7.12 | length 5.1
  Top Layer w0.381: IC6.14 58.548,5.842 59.401,5.842 59.646,5.597 59.646,5.227 59.956,4.917 60.96,4.917 61.307,5.264 IC7.12@62.877,5.264 ; IC7.12@62.877,5.264 IC7.12
SCKMain: IC7.5 J2.6 | length 7.6
  Top Layer w0.381: IC7.5 69.55,5.265 71.343,7.058 73.763,7.058 73.986,7.281 73.986,8.218 J2.6
SyncISO0: IC6.11 IC7.14 | length 3.8
  Top Layer w0.381: IC6.11 58.548,3.892 59.06,3.892 59.306,3.647 61.486,3.647 61.833,3.993 62.082,3.993
SyncMain: IC7.3 J2.4 | length 7.1
  Top Layer w0.381: IC7.3 69.718,3.995 70.103,4.379 73.625,4.379 74.027,4.781 74.027,5.718 J2.4
v12iso: C2.2 C6.2 C7.2 C8.2 C9.2 C23.2 IC1.3 IC2.3 IC3.3 IC3.7 | length 21.3
  Top Layer w0.406: IC3.7 32.394,7.406 32.832,6.969 33.685,6.969 v1(33.798,6.855) 33.044,6.101 IC3.3
  Layer 2 w1.524: 33.125,7.528 v1(33.798,6.855)
  Bottom Layer w0.508: v1(17.184,9.068) 17.243,9.01 18.192,9.01 18.25,9.068 18.759,9.068 IC1.3 ; IC1.3@18.751,8.859 IC1.3 ; C9.2 18.819,9.938 19.304,9.453 19.304,9.105 19.058,8.859 IC1.3 ; IC1.3@19.333,8.859 19.579,9.105 19.579,9.613 19.913,9.948 20.474,9.948 C2.2@20.815,10.288 ; C23.2 31.969,9.72 31.969,7.865 C8.2 32.119,7.812 32.982,6.949 33.704,6.949 v1(33.798,6.855)
  Bottom Layer w1.016: C7.2@42.608,10.063 C7.2
  Bottom Layer w1.524: v1(18.25,9.169) 18.505,8.914 IC1.3@18.505,8.613
  Bottom Layer w2.032: IC2.3 42.608,7.658 v1(42.608,8.319) C7.2@42.608,10.063
VCCmain: C22.1 IC7.1 J2.2 | length 7.2
  Top Layer w0.381: IC7.1 68.327,2.698 69.245,2.698 70.049,1.894 70.049,1.571 70.188,1.432 70.521,1.432 70.746,1.207 72.784,1.207 J2.2@74.118,2.541
VCOMF02: IC4.2
VCOMF03: IC5.2
VCOMlvlShift: IC3.2 R5.1 R12.2 | length 5.7
  Top Layer w0.406: v1(32.102,6.351) 32.394,6.058 IC3.2
  Bottom Layer w0.406: v1(32.102,6.351) 33.507,4.945 33.507,4.18 R12.2 33.677,4.045 34.841,4.045 R5.1
pads on no net: IC2.4 IC6.3 IC6.4 IC6.7 IC6.8 IC6.9 IC6.10 IC6.13 R23.1 U1.3 U1.5

## Polygon pours and split planes (outlines as drawn)
GND on Layer 1 "GND_L02_P009" (solid, pour order 9): 67.439,0.709 67.439,13.409 76.194,13.409 76.194,0.709
GND on Layer 1 "GND_L02_P004" (solid, pour order 4): 67.512,0.709 67.496,0.726 67.496,13.409 76.403,13.409 76.403,0.709
GNDISO0 on Layer 1 "GNDISO0_L02_P010" (solid, pour order 10): 63.991,0.508 0.212,0.508 0,0.72 0,13.409 63.991,13.409
v12iso on Layer 2 "V12ISO_L03_P014" (solid, pour order 14): 14.502,0.709 9.576,0.709 9.576,9.652 21.728,9.652 21.728,8.056 22.67,7.114 21.386,5.83 12.126,5.83 12.126,4.899 12.376,4.649 12.42,4.693 14.66,4.693
GNDISO0 on Layer 2 "GNDISO0_L03_P017" (solid, pour order 17): 63.991,0.508 63.991,13.409 0,13.409 0,0.508
3v3iso0 on Layer 2 "3V3ISO0_L03_P011" (solid, pour order 11): 61.864,4.628 61.864,2.185 58.89,2.185 58.077,2.998 58.077,4.628
v12iso on Layer 2 "V12ISO_L03_P002" (solid, pour order 2): 53.905,9.664 21.728,9.664 21.728,8.043 22.663,7.107 51.348,7.107
3v3iso0 on Layer 2 "3V3ISO0_L03_P001" (solid, pour order 1): 22.488,4.404 59.848,4.404 59.848,7.869 22.626,7.869
GNDISO0 on Bottom Layer "GNDISO0_L04_P013" (solid, pour order 13): 57.736,13.409 57.858,13.287 57.858,0.709 0.012,0.709 0,0.72 0,13.409
3v3iso0 on Bottom Layer "3V3ISO0_L04_P016" (solid, pour order 16): 48.156,9.92 47.717,10.358 43.846,10.358 43.846,7.095 44.952,5.989 47.275,5.989 48.236,6.949
GNDISO0 on Bottom Layer "GNDISO0_L04_P003" (solid, pour order 3): 57.385,10.402 56.718,9.735 54.959,9.735 54.242,10.452 53.638,10.452 53.638,10.901 55.031,12.294 57.385,12.294
GND on Top Layer "GND_L01_P008" (solid, pour order 8): 67.439,0.709 67.439,13.409 76.194,13.409 76.194,0.709
GNDISO0 on Top Layer "GNDISO0_L01_P015" (solid, pour order 15): 53.375,13.409 53.375,0.508 0,0.508 0,13.409

## Other copper
Top Layer:
  pour cut-out: 3.89,7.111 3.81,7.031 3.81,5.386 19.22,5.386 20.698,6.865

## Silkscreen, mask and mechanical layers (free items; w line width, h text height)
Top Overlay:
  text "MISO GND / MOSI SCK / CS   Sync / NC   VCC" at 64.643,8.416 h0.61
  text "GND (B) / PT- (G) / PT+ (W) / 24V (R)" at 12.429,4.774 h0.64
  text "PSP-AC PTv3 / Leo Steinberg" at 52.017,0.508 h0.61
Bottom Overlay:
  region: 11.937,5.554 21.981,5.554 21.981,7.557 22.007,7.583 21.96,7.63 11.989,7.63

## Dimensions
14.096,3.248 to 74.096,3.248 on Dimensions